# Altium PCB smoke_detector.PcbDoc
Units mm, origin at the board's own origin, x right, y up, seen from the top; angles counter-clockwise.
Board outline 85 x 24 mm, 4 copper layers (Top Copper, Signal Layer 1, Signal Layer 2, Bottom Copper), stack 0.97 mm thick; 42 components, 27 nets, 153 pads, 102 vias.
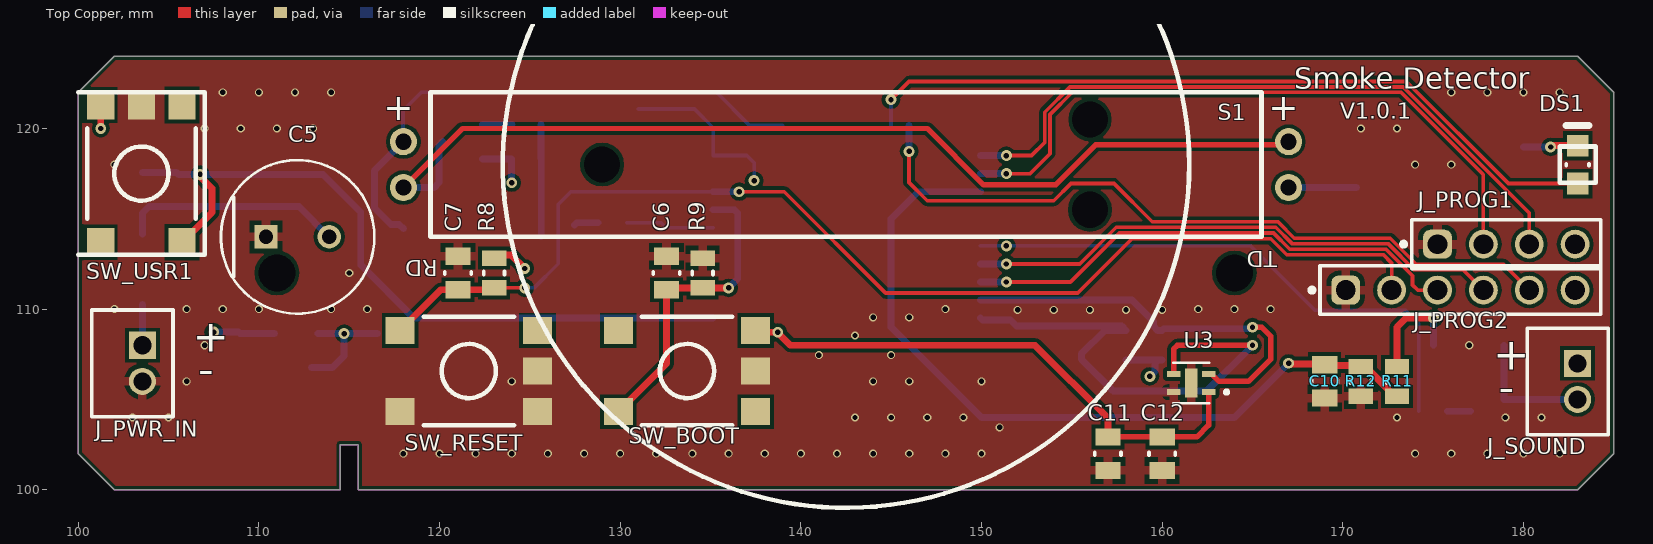
[diagram p0: Top Copper view]
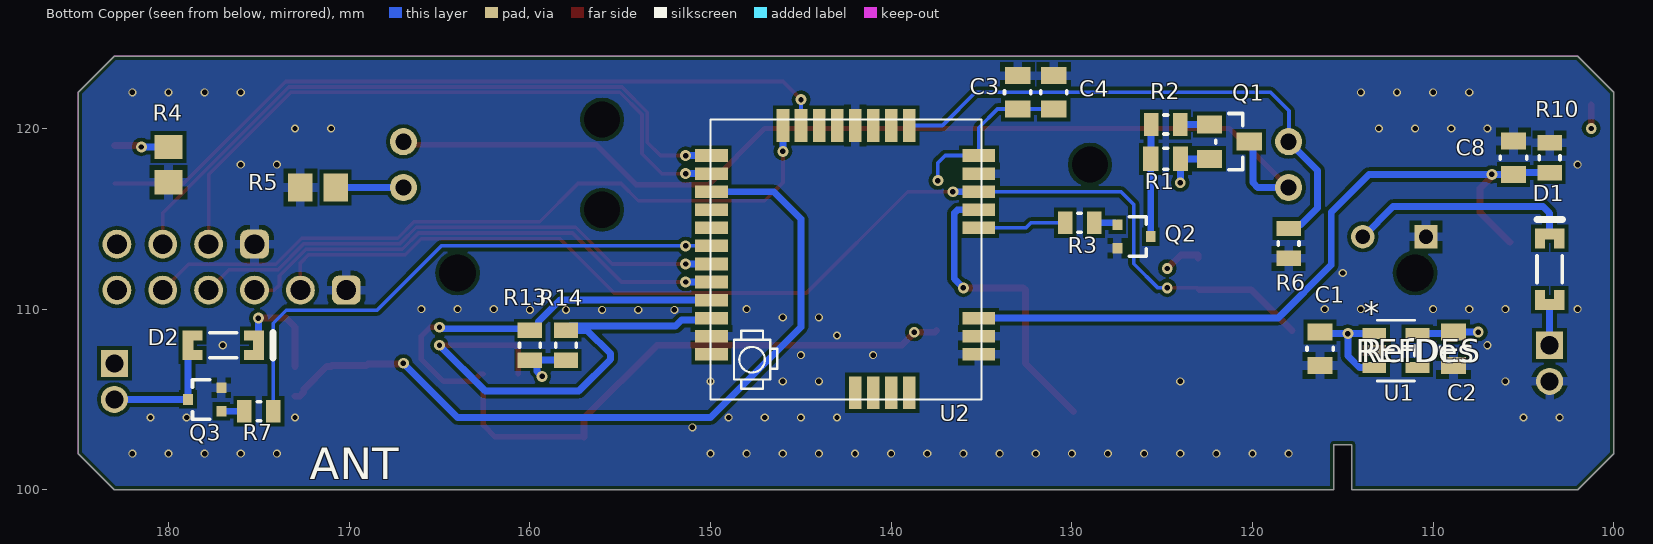
[diagram p1: Bottom Copper view, seen from below]
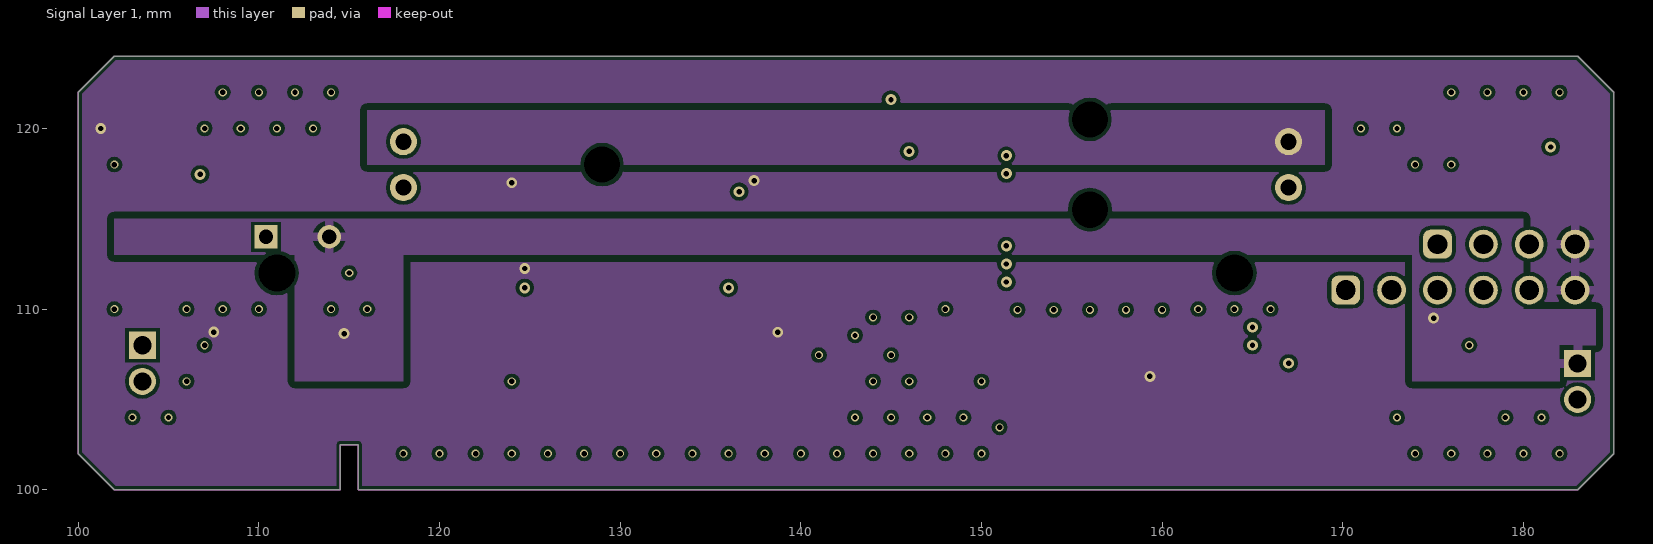
[diagram p2: Signal Layer 1]
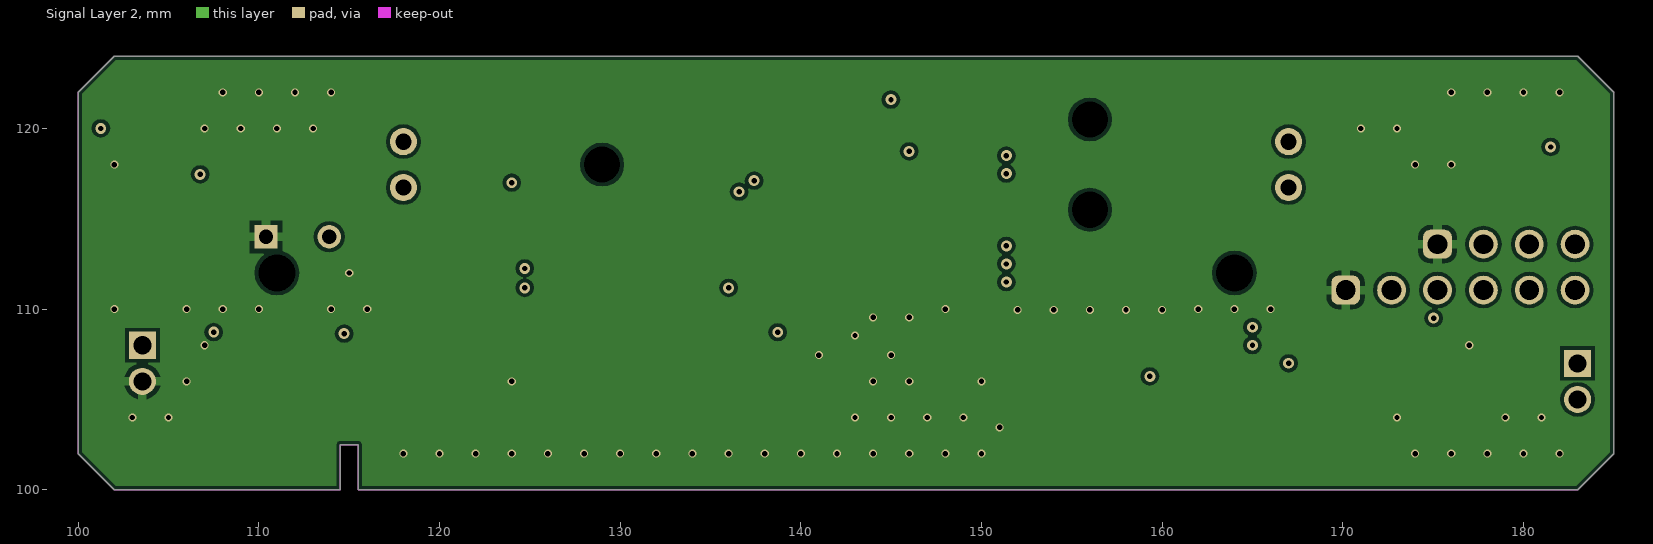
[diagram p3: Signal Layer 2]

## Layer stack, top to bottom
Top Mask: solder mask 0.015, Solder Resist, Dk 3.8
Top Copper: signal copper 0.035
Dielectric 1: prepreg 0.2, 7628, Dk 4.6
Signal Layer 1: signal copper 0.0175
Core: core 0.465, FR-4, Dk 4.5
Signal Layer 2: signal copper 0.0175
Dielectric 2: prepreg 0.2, 7628, Dk 4.6
Bottom Copper: signal copper 0.035
Bottom Mask: solder mask 0.015, Solder Resist, Dk 3.8

## Board outline
102,100 100,102 100,122 102,124 183,124 185,122 185,102 183,100 115.5,100 115.5,102.5 114.5,102.5 114.5,100

## Design rules (kind name [scope] priority, off if disabled: settings)
BoardOutlineClearance [All] p1: gap=0.2 ignorepadtopadclearanceinfootprint=FALSE except(0.4: Arc-SplitBarrior Arc-SplitContinuation Track-SplitBarrior Track-SplitContinuation SMDPad-SplitBarrior SMDPad-SplitContinuation THPad-SplitBarrior THPad-SplitContinuation Via-SplitBarrior Via-SplitContinuation Fill-SplitBarrior Fill-SplitContinuation Poly-SplitBarrior Poly-SplitContinuation Region-SplitBarrior Region-SplitContinuation Text-SplitBarrior Text-SplitContinuation)
Clearance [All] p1: gap=0.2 ignorepadtopadclearanceinfootprint=FALSE except(0.089: Arc-Arc Arc-Track Arc-SMDPad Track-Track Track-SMDPad SMDPad-SMDPad; 0.127: Arc-Via Track-Via SMDPad-Via THPad-Via Via-Via; 0.254: Arc-Text Track-Text SMDPad-Text THPad-Text Via-Text Fill-Text Poly-Text Region-Text Text-Text; 0.381: Poly-Poly)
HoleSize [All] p1: absolutevalues=TRUE maxlimit=6.3 minlimit=0.2 maxpercent=80.000 minpercent=20.000
MinimumAnnularRing [All] p1: minimumring=0.076
MinimumSolderMaskSliver [All] p1: minsoldermaskwidth=0.1
PolygonConnect PolygonConnect_Inner [(InNamedPolygon('Signal Layer 1-NetQ1_3') OR InNamedPolygon('Signal Layer 1-V_3V3') OR InNamedPolygon('Signal Layer 1-V_IN') OR InNamedPolygon('Signal Layer 2-GND'))] p1: connectstyle=Direct reliefconductorwidth=0.508 reliefentries=4 polygonreliefangle="90 Angle" airgapwidth=0.254
PolygonConnect [All] p2: thpad.connectstyle=Relief thpad.reliefconductorwidth=0.508 thpad.reliefentries=4 thpad.polygonreliefangle="90 Angle" thpad.airgapwidth=0.254 smdpad.connectstyle=Relief smdpad.reliefconductorwidth=0.508 smdpad.reliefentries=4 smdpad.polygonreliefangle="90 Angle" smdpad.airgapwidth=0.254 via.connectstyle=Direct via.reliefconductorwidth=0.508 via.reliefentries=4 via.polygonreliefangle="90 Angle" via.airgapwidth=0.254
RoutingCorners [All] p1: cornerstyle=Round minsetback=2.54 maxsetback=2.54
RoutingVias [All] p1: holewidth=0.3 width=0.45 viastyle="Through Hole" minholewidth=0.2 minwidth=0.45 maxholewidth=1 maxwidth=2
SilkToSilkClearance [All] p1: silktosilkclearance=0.1
SilkToSolderMaskClearance [IsPad] p1: minsilkscreentomaskgap=0.1 clearancetoexposedcopper=TRUE
SolderMaskExpansion [All] p1: expansion=0.102 istentingtop=FALSE
Width [All] p1: maxlimit=2.54 minlimit=0.089 preferedwidth=0.381
25 further rules are at their usual default settings.

## Components (designator, comment, footprint, x,y, rotation, side; value= is the part's Value field where it differs from the comment)
C1 "CC0805KFX7R7BB105" FP-CC0805-0_85-MFG 116.259,107.803 r270 bottom value="1 uF"
C2 "CC0805KFX7R7BB105" FP-CC0805-0_85-MFG 108.872,107.803 r270 bottom value="1 uF"
C3 "CC0805KFX7R7BB105" FP-CC0805-0_85-MFG 133,122 r90 bottom value="1 uF"
C4 "CC0805KRX7R7BB104" FP-CC0805-0_85-MFG 131,122 r90 bottom value="100 nF"
C5 "EEUFC1C221B" FP-RAD-TH-D_8_0_5-L_11_5-MFG 112.145,114 r0 top locked
C6 "CC0805KRX7R7BB104" FP-CC0805-0_85-MFG 132.564,112 r90 top value="100 nF"
C7 "CC0805KRX7R7BB104" FP-CC0805-0_85-MFG 121.024,112 r90 top value="100 nF"
C8 "CC0805KRX7R7BB104" FP-CC0805-0_85-MFG 105.55,118.38 r90 bottom value="100 nF"
C10 "CC0805KRX7R7BB104" FP-CC0805-0_85-MFG 169,106 r270 top value="100 nF"
C11 "CC0805KRX7R7BB104" FP-CC0805-0_85-MFG 157,102 r270 top value="100 nF"
C12 "CC0805KRX7R7BB104" FP-CC0805-0_85-MFG 160,102 r270 top value="100 nF"
D1 "LL4148" FAIR-SOD80-2_V 103.55,112.215 r90 bottom
D2 "LL4148" FAIR-SOD80-2_V 176.975,108 r180 bottom
DS1 "LTST-C170KRKT" LTST-C170KRKT_V 183,118 r90 top locked
J_PROG1 "61300411121" 61300411121 179.051,113.594 r0 top locked
J_PROG2 "61300611121" 61300611121 176.511,111.054 r0 top locked
J_PWR_IN "B2B-PH-K-S(LF)(SN)" JST-B2B-PH-K-S_V 103,107 r270 top
J_SOUND "B2B-PH-K-S(LF)(SN)" JST-B2B-PH-K-S_V 182.45,106 r270 top locked
Q1 "KST92MTF" FP-318BM-MFG 121.279,119.27 r180 bottom
Q2 "BC847BW,115" FP-SOT323-MFG 126.556,114.017 r180 bottom
Q3 "BC847BW,115" FP-SOT323-MFG 178,105 r0 bottom
R1 "SG73S2ATTD1002F" RESC2013X60X30LL20T20 124.807,118.32 r0 bottom value=10kR
R2 "RC0805JR-131KL" RESC2013X60X35LL10T20 124.807,120.22 r180 bottom value=1kR
R3 "RC0805JR-131KL" RESC2013X60X35LL10T20 129.568,114.783 r180 bottom value=1kR
R4 "ERJ-6GEYJ331V" RESC2013X70X40ML20T20 180,118 r90 bottom locked value=330R
R5 "ERJ-6GEYJ331V" RESC2013X70X40ML20T20 171.73,116.73 r180 bottom value=330R
R6 "SG73S2ATTD1002F" RESC2013X60X30LL20T20 118,113.635 r90 bottom value=10kR
R7 "RC0805JR-131KL" RESC2013X60X35LL10T20 175,104.35 r0 bottom value=1kR
R8 "SG73S2ATTD1002F" RESC2013X60X30LL20T20 123.024,112 r90 top value=10kR
R9 "SG73S2ATTD1002F" RESC2013X60X30LL20T20 134.564,112 r270 top value=10kR
R10 "SG73S2ATTD1002F" RESC2013X60X30LL20T20 103.55,118.38 r270 bottom value=10kR
R11 "SG73S2ATTD1002F" RESC2013X60X30LL20T20 173,106 r90 top value=1MR
R12 "SG73S2ATTD1002F" RESC2013X60X30LL20T20 171,106 r90 top value=2MR
R13 "SG73S2ATTD1002F" RESC2013X60X30LL20T20 160,108 r270 bottom value=10kR
R14 "SG73S2ATTD1002F" RESC2013X60X30LL20T20 158,108 r270 bottom value=10kR
S1 "Smoke IR Sensor" smoke_ir_sensor_1 142.5,118 r180 top locked
SW_BOOT "tactile_6_by_6_mm" tactile_6_by_6_mm 133.699,106.574 r0 top
SW_RESET "tactile_6_by_6_mm" tactile_6_by_6_mm 121.62,106.574 r0 top
SW_USR1 "tactile_6_by_6_mm" tactile_6_by_6_mm 103.5,117.5 r90 top locked
U1 "RT9013-33GB" SOT-23-5_RIT 112.066,107.703 r180 bottom
U2 "RAK3172" RAK3172 135,105 r90 bottom locked
U3 "SHTC3" SON100P200X200X80-5N 161.604,105.908 r180 top

## Footprints (in the part's own frame and the unit in brackets; to place one, negate y for a bottom-side part, rotate by r counter-clockwise, add the part's x,y. Pads: shape width x height; smd on the part's side, far side on the other; paste and mask are expansions set on the pad)
61300411121 [mm]
  rrect50% 1.6x1.6 hole 1.1: 1(-3.81,0)
  round 1.6 hole 1.1: 2(-1.27,0) 3(1.27,0) 4(3.81,0)
  silkscreen extent -5.8,-1.35 5.23,1.35, body extent -5.08,-1.27 5.08,1.27, height 8.57
61300611121 [mm]
  rrect50% 1.6x1.6 hole 1.1: 1(-6.35,0)
  round 1.6 hole 1.1: 2(-3.81,0) 3(-1.27,0) 4(1.27,0) 5(3.81,0) 6(6.35,0)
  silkscreen extent -8.34,-1.35 7.77,1.35, body extent -7.62,-1.27 7.62,1.27, height 8.57
FAIR-SOD80-2_V [mm]
  rect 0.6x1.65 smd: 1(-1.95,0) 2(1.95,0)
  rect 1.1x0.575 smd: ""(-1.7,-0.537) ""(-1.7,0.537) ""(1.7,-0.537) ""(1.7,0.537)
  silkscreen extent -0.75,-0.7 2.75,0.7, body extent -1.73,-0.7 1.72,0.7, height 2.1
FP-318BM-MFG [mm]
  rect 1.4x1 smd paste+0 mask+0: 1(-1.1,0.95) 2(-1.1,-0.95) 3(1.1,0)
  silkscreen extent -0.75,-1.56 0.75,1.56, body extent -1.2,-1.46 1.2,1.46, height 1.2
FP-CC0805-0_85-MFG [mm]
  rect 0.95x1.4 smd paste+0 mask+0: 1(-0.925,0) 2(0.925,0)
  silkscreen extent -0.08,-0.72 0.08,0.72, body extent -1,-0.63 1,0.63, height 0.95
FP-RAD-TH-D_8_0_5-L_11_5-MFG [mm]
  rect 1.3x1.3 hole 0.8 paste-2539.97 mask+0: 1(-1.75,0)
  round 1.3 hole 0.8 paste-2539.97 mask+0: 2(1.75,0)
  silkscreen extent -4.25,-4.25 4.25,4.25, body extent -4.35,-4.35 4.35,4.35, height 0.25
FP-SOT323-MFG [mm]
  rect 0.55x0.6 smd paste-1000 mask+0: 1(-0.925,0.65) 2(-0.925,-0.65) 3(0.925,0)
  silkscreen extent -0.28,-1.1 0.67,1.1, body extent -1.05,-1 1.05,1, height 1.1
JST-B2B-PH-K-S_V [mm]
  rect 1.5x1.5 hole 1: 1(-1,0.55)
  round 1.5 hole 1: 2(1,0.55)
  silkscreen extent -2.95,-2.25 2.95,2.25, body extent -2.95,-2.25 2.95,2.25, height 6
LTST-C170KRKT_V [mm]
  rect 1.2x1.2 smd: 1(-1.05,0) 2(1.05,0)
  silkscreen extent -0.05,-0.63 2.16,0.64, body extent -1,-0.63 1,0.63, height 1.2
RAK3172 [mm]
  rect 0.7x1.8 smd: 1(13.5,14.945) 2(12.5,14.945) 3(11.5,14.945) 4(10.5,14.945) 5(9.5,14.945) 6(8.5,14.945) 7(7.5,14.945) 8(6.5,14.945) 9(5.5,14.945) 10(4.5,14.945) 11(3.5,14.945) 12(2.5,14.945) 17(2.5,0.145) 18(3.5,0.145) 19(4.5,0.145) 20(9.5,0.145) 21(10.5,0.145) 22(11.5,0.145) 23(12.5,0.145) 24(13.5,0.145)
  rect 1.8x0.7 smd: 13(0.365,6.99) 14(0.365,5.99) 15(0.365,4.99) 16(0.365,3.99) 25(15.165,3.99) 26(15.165,4.99) 27(15.165,5.99) 28(15.165,6.99) 29(15.165,7.99) 30(15.165,8.99) 31(15.165,9.99) 32(15.165,10.99)
  silkscreen extent 0,0 15.5,15
RESC2013X60X30LL20T20 [mm]
  rect 0.85x1.35 smd: 1(-0.825,0) 2(0.825,0)
  silkscreen extent -0.1,-0.58 0.1,0.58, body extent -1.1,-0.72 1.1,0.72, height 0.6
RESC2013X60X35LL10T20 [mm]
  rect 0.8x1.25 smd: 1(-0.8,0) 2(0.8,0)
  silkscreen extent -0.1,-0.53 0.1,0.53, body extent -1.05,-0.67 1.05,0.67, height 0.6
RESC2013X70X40ML20T20 [mm]
  rect 1.35x1.55 smd: 1(-0.975,0) 2(0.975,0)
  body extent -1.1,-0.72 1.1,0.72, height 0.7
smoke_ir_sensor_1 [mm]
  round 0 hole 2 unplated: 0(-13.5,-2.5) 0(-13.5,2.5) 0(13.5,0)
  round 1.5 hole 0.9: 1(-24.5,-1.27) 2(-24.5,1.27) 3(24.5,-1.27) 4(24.5,1.27)
  silkscreen extent -23,-19 23,19
SON100P200X200X80-5N [mm]
  rrect25% 0.75x0.35 smd: 1(-0.97,0.5) 2(-0.97,-0.5) 3(0.97,-0.5) 4(0.97,0.5)
  rect 0.7x1.6 smd: 5(0,0)
  silkscreen extent -2.06,-1.12 1,1.12, body extent -0.94,-0.64 1.06,1.36, height 0.75
SOT-23-5_RIT [mil]
  rect 52x24 smd paste+0 mask+0: 1(-47,36.99) 2(-47,0) 3(-47,-36.99) 4(47,-36.99) 5(47,36.99)
  silkscreen extent -41,-66 41,66, body extent -59,-61 59,61, height 67
tactile_6_by_6_mm [mm]
  rect 1.6x1.5 smd: 1(-3.8,2.25) 2(3.8,2.25) 3(-3.8,-2.25) 4(3.8,-2.25) 5(3.8,0)
  silkscreen extent -2.5,-3 2.5,3

## Part data
C1 C2 C3: library part CMP-03422-000058-1, "CC0805 1 uF X7R 10.00% 16 V", Capacitance="1 uF", Manufacturer=Yageo, Package=CC0805-0.85, Temperature="-30°C to +85°C", Temperature Characteristic=X7R, Temperature Range High=+85°C, Temperature Range Low=-30°C, Tolerance=0.1, Voltage Rating="16 V", Automotive=No, Category=Cap, ComponentLink2Description=Datasheet, ComponentLink2URL=http://www.yageo.com/documents/recent/UPY-GPHC_Y5V_6.3V-to-50V_8.pdf, Device Class L1="Passive Components", Device Class L2=Capacitors, Device Class L3="Ceramic Capacitors", Footprint Url=http://www.yageo.com/exep/pages/download/literatures/UPY-C_GEN_24.pdf, Height=0.95mm, Ipc Land Pattern Name=CAPC200125X85, Lead Free=Yes, Manufacturer Part Number=CC0805KFX7R7BB105, Material=Ceramic, Mouser Description="Multilayer Ceramic Capacitors MLCC - SMD/SMT 1.0uF 16V X7R 10%", Octopart=https://octopart.com/cc0805kfx7r7bb105-yageo-30261725, RoHS=TRUE
C4 C6 C7 C8 C10 C11 C12: library part CMP-1036-04402-6, "CAP CER 0.1UF 16V X7R 0805", Capacitance="100 nF", Manufacturer=Yageo, Package=CC0805-0.85, Temperature="-30°C to +85°C", Temperature Characteristic=X7R, Temperature Range High=+85°C, Temperature Range Low=-30°C, Tolerance=0.1, Voltage Rating="16 V", Automotive=No, Category=Cap, ComponentLink2Description=Datasheet, ComponentLink2URL=http://www.yageo.com/documents/recent/UPY-GPHC_Y5V_6.3V-to-50V_8.pdf, Device Class L1="Passive Components", Device Class L2=Capacitors, Device Class L3="Ceramic Capacitors", Digikey Description="CAP CER 0.1UF 16V X7R 0805", Footprint Url=http://www.yageo.com/exep/pages/download/literatures/UPY-C_GEN_24.pdf, Height=0.95mm, Ipc Land Pattern Name=CAPC200125X85, Lead Free=Yes, Manufacturer Part Number=CC0805KRX7R7BB104, Material=Ceramic, Mouser Description="Multilayer Ceramic Capacitors MLCC - SMD/SMT 100nF 16V X7R 10%", Octopart=https://octopart.com/cc0805krx7r7bb104-yageo-39467769, RoHS=TRUE
C5: library part CMP-05427-002014-1, "Aluminum Electrolytic Capacitors (Radial Lead Type) AEC-Q200 Qualified 220uF ±20% 16V", Capacitance=220uF, Case/Package=Radial, Max Operating Temperature=105°C, Min Operating Temperature=-55°C, Package Quantity=1000, Ratings=AEC-Q200, Ripple Current=555mA, Tolerance=20%, Voltage Rating=16V, Diameter=8mm, Height=11.5mm, Height - Seated (Max)=0.492inch, Impedance=117mR, Lead Diameter=0.6mm, Lead Pitch=5mm, Length=11mm, Life (Hours)=2000Hour, Mount="Through Hole", Packaging="Ammo Pack", Polarity=Polar, Radiation Hardening=No, RoHS Compliant=Yes, Series=FC, Termination=Radial, Voltage Rating (DC)=16V
D1 D2: library part CMP-2000-05115-2, "Small Signal Diode, 100 V, 0.2 A, -55 to 175 degC, 2-Pin SOD80, RoHS, Tape and Reel", Average Forward Current-Max=200mA, Forward Voltage=1V, Manufacturer=Fairchild, Power Dissipation=500mW, Reverse Voltage-Max [Vrrm]=100V, Datasheet URL=https://www.fairchildsemi.com/datasheets/LL/LL4148.pdf, Datasheet Version="Rev. 1.8, 01/2016", Manufacturer URL=https://www.fairchildsemi.com/, Reverse Recovery Time-Max=1ns
DS1: library part CMP-2000-07593-1, "LED Red, 75 mW, 54 mcd, -55 to 85 degC, 2-Pin SMD, RoHS, Tape and Reel", Case Code (Imperial)=0805, Case Code (Metric)=2012, Colour=Red, Forward Current=30mA, Forward Voltage=2V, Lens Colour=Colorless, Manufacturer=Lite-On, Max Operating Temperature=85degC, Min Operating Temperature=-55degC, Package Description="2-Pin Surface Mount Device, Body 2 x 1.25 mm", Package Quantity=1, Package Reference=C170KRKT, Power Dissipation=75mW, Test Current=20mA, Case\/Package=0805, Datasheet URL=http://optoelectronics.liteon.com/upload/download/DS-22-99-0150/LTST-C170KRKT.pdf, Datasheet Version="Rev. D, 11/2014", Depth=1.6mm, Dominant Wavelength=631nm, Height=1.1mm, Illumination Colour=Red, Lead Free=LeadFree, Length=3.2mm, Lens Style=Rectangular, Lens Transparency=Clear, Luminous Intensity=54mcd, Manufacturer URL=http://www.us.liteon.com/, Mount=SurfaceMount, Mounting Technology=SurfaceMount, Number of Elements=1, Number of LEDs=1, Number of Pins=2, Packaging=TapeandReel, Power Rating=75mW, Radiation Hardening=No, RoHSCompliant=True, Viewing Angle=130degrees, Wavelength=639nm, Width=1.25mm
J_PROG1: library part CMP-1502-01064-3, Color=Black, Contact Resistance=20mΩ, Current Rating=3A, Max Operating Temperature=105°C, Min Operating Temperature=-40°C, Operating Supply Voltage=250V, Connector Type="Male Pin", Contact Material=Copper, Contact Mating Length=5.9944mm, Contact Plating=Gold, Gender=Male, Height=8.89mm, Lead Free="Lead Free", Lead Pitch=2.54mm, Mount="Through Hole", NexarPartId=32855522, Number of Contacts=4, Number of Pins=4, Number of Positions=4, Number of Rows=1, Orientation=Vertical, Packaging=Bulk, Pitch=2.54mm, REACH SVHC=Unknown, RoHS=Compliant, Termination=Solder, Voltage Rating=250V
J_PROG2: library part CMP-1502-01070-3, Color=Black, Contact Resistance=20mΩ, Current Rating=3A, Max Operating Temperature=105°C, Min Operating Temperature=-40°C, Operating Supply Voltage=250V, Connector Type="Male Pin", Contact Gender=Male, Contact Material=Copper, Contact Mating Length=5.9944mm, Contact Plating=Gold, Gender=Male, Height=8.89mm, Housing Material=PBT, Lead Free="Lead Free", Lead Pitch=2.54mm, Mount="Through Hole", NexarPartId=20084590, Number of Contacts=6, Number of Pins=6, Number of Positions=6, Number of Rows=1, Orientation=Vertical, Packaging=Bulk, Pitch=2.54mm, REACH SVHC=Unknown, RoHS=Compliant, Termination="Through Hole", Voltage Rating=250V
J_PWR_IN J_SOUND: library part CMP-2000-05162-1, "Male Header, Pitch 2 mm, 1 x 2 Position, Height 6 mm, Tail Length 3.4 mm, -25 to 85 degC, RoHS, Bulk", Manufacturer=JST, Datasheet URL=http://datasheet.octopart.com/B2B-PH-K-S%28LF%29%28SN%29-JST-datasheet-8324864.pdf, Datasheet Version=Nov-08, Manufacturer URL=http://www.jst.com/home2.html, No of Positions=2, Pitch=2mm, Style/Orientation=StraightHeader/Plug, Termination=Crimp, Type=ShroudedHeader
Q1: library part CMP-00278-84329678-1, "KST92MTF Trans Gp Bjt PNP 300V 0.5A 250MW 3-PIN SOT-23 T/r / Trans PNP 300V 0.5A SOT23", Case/Package=SOT-23, Collector Base Voltage (VCBO)=-300V, Collector Emitter Saturation Voltage=-500mV, Current=5A, Current Rating=-500mA, Emitter Base Voltage (VEBO)=-5V, Frequency=50MHz, Manufacturer Lifecycle Status=OBSOLETE, Max Breakdown Voltage=300V, Max Junction Temperature (Tj)=150°C, Max Power Dissipation=250mW, Min Operating Temperature=-55°C, Power Dissipation=350mW, Voltage=200V, Collector Emitter Breakdown Voltage=-300V, Collector Emitter Voltage (VCEO)=-300V, Element Configuration=Single, Gain Bandwidth Product=50MHz, Height=1.2mm, hFE Min=25, Lead Free="Lead Free", Length=2.9mm, Lifecycle Status=Obsolete, Max Collector Current=-500mA, Max Frequency=50MHz, Max Operating Temperature=150°C, Mount="Surface Mount", NexarPartId=84329678, Number of Elements=1, Number of Pins=3, Packaging="Cut Tape", Polarity=PNP, Radiation Hardening=No, REACH SVHC="No SVHC", RoHS=Compliant, Schedule B=8541210080, Transition Frequency=50MHz, Voltage Rating (DC)=-300V, Weight=59.987591mg, Width=1.3mm
Q2 Q3: library part CMP-14406-000044-1, "TRANS NPN 45V 100MA SOT323", RoHS Compliant=Yes
R1 R6 R8 R9 R10 R11 R12 R13 R14: library part CMP-2001-02616-1, Manufacturer="KOA Speer", Part Number=SG73S2ATTD1002F
R2 R3 R7: library part CMP-2001-01418-1, Manufacturer=Yageo, Part Number=RC0805JR-131KL
R4 R5: library part CMP-1013-00062-2, Manufacturer=Panasonic, Part Number=ERJ-6GEYJ331V
S1: library part smoke_ir_sensor_1
U1: "No Description Available", Manufacturer_Name="Richtek Technology", Copyright="Copyright (C) 2025 Ultra Librarian. All rights reserved.", Manufacturer_Part_Number=RT9013-33GB, RefDes=RefDes, Type=Type
U2: "RAK3172 is a low-power long-range transceiver module based on the STM32WLE5CC chip. It provides an easy-to-use, small-size, low-power solution for long range wireless data applications", Package=Package, Availability="Not in stock", Check_prices=https://www.snapeda.com/parts/RAK3172/Shenzhen+RAKwireless+Technology+Co.%252CLtd./view-part/?ref=eda, MF="Shenzhen RAKwireless Technology Co.,Ltd.", MP=RAK3172, Price=None, SnapEDA_Link=https://www.snapeda.com/parts/RAK3172/Shenzhen+RAKwireless+Technology+Co.%252CLtd./view-part/?ref=snap
U3: "SENSOR HUMI/TEMP I2C 2% SMD", Package="DFN-4 Sensirion", Check_prices=https://www.snapeda.com/parts/SHTC3/Sensirion/view-part/?ref=eda, MF="Sensirion AG", MP=SHTC3, SnapEDA_Link=https://www.snapeda.com/parts/SHTC3/Sensirion/view-part/?ref=snap

## Free pads (board coordinates)
  rect 0x0 hole 2.05 unplated: 0(111,112) 1(164,112)

## Via types
v1: diameter 0.45, hole 0.3, Top Copper to Bottom Copper, 78 vias
v2: diameter 0.6, hole 0.3, Top Copper to Bottom Copper, tented both sides, 24 vias

## Nets (pads, with @x,y where several pads share a name; then routed paths per layer and width w, separated by ;. In a path a pad name is that pad's centre, name@x,y a point inside that pad or via, vN(x,y) a via of type N, cw(c..) or ccw(c..) an arc to the next point about the centre after c; other vN are vias at no path point)
BAT: C10.1 R11.1 R12.2 U2.3 | length 43.7
  Top Copper w0.381: v2(167,107) 167.037,106.962 168.962,106.962 169.05,106.875 170.95,106.875 R12.2 171.25,106.825 172.515,105.559 172.515,105.409 172.75,105.175 R11.1
  Bottom Copper w0.381: U2.3 146.5,116.5 145,115 145,109 150,104 164,104 v2(167,107)
BTN_USR1: C8.1 R10.2 SW_USR1.3 U2.19 | length 41.4
  Top Copper w0.381: SW_USR1.3 107.41,115.36 107.41,116.69 106.75,117.35 v2(106.75,117.455)
  Bottom Copper w0.381: R10.2 105.45,117.555 C8.1 v2(106.75,117.455) 113.545,117.455 115.642,115.358 115.642,112.431 118.574,109.5 U2.19
BUZZER_CTRL: R7.1 U2.6 | length 30.9
  Bottom Copper w0.203: U2.6 164.905,113.5 168.461,109.945 173.478,109.945 174.2,109.223 R7.1
  other v2: 151.381,113.5
GND: C1.2 C2.2 C3.2 C4.2 C5.1 C6.2 C7.2 C8.2 C10.2 C11.2 C12.2 J_PROG1.1 J_PROG2.1 J_PWR_IN.2 Q2.2 Q3.2 R4.1 R5.1 R6.1 R9.1 R10.1 R12.1 SW_BOOT.5 SW_RESET.3 SW_RESET.4 SW_RESET.5 SW_USR1.5 U1.2 U2.11 U2.17 U2.18 U2.23 U2.28 U3.4 U3.5
  other v1: 118,102 120,102 122,102 124,102 126,102 128,102 130,102 132,102 134,102 136,102 138,102 140,102 142,102 144,102 146,102 148,102 150,102 174,102 176,102 178,102 180,102 182,102 151,103.457 103,104 105,104 143,104 145,104 147,104 149,104 173,104 179,104 181,104 106,106 124,106 144,106 146,106 150,106 141,107.457 145,107.457 107,108 177,108 143,108.543 144,109.543 146,109.543 152,109.957 154,109.957 156,109.957 158,109.957 160,109.957 102,110 106,110 108,110 110,110 114,110 116,110 148,110 162,110 164,110 166,110 166,110 115,112 102,118 174,118 176,118 107,120 109,120 111,120 113,120 171,120 173,120 108,122 110,122 112,122 114,122 176,122 178,122 180,122 182,122
IR_ADC: R6.2 S1.3 U2.25 | length 30.3
  Bottom Copper w0.203: S1.3 117.978,119.292 117.978,120.978 119,122 135.328,122 137.163,120.165 U2.25
  Bottom Copper w0.381: R6.2 117.765,114.695 117.305,114.695 116.398,115.602 116.398,117.668 S1.3
IR_CTRL: R3.1 U2.20 | length 4.9
  Bottom Copper w0.203: R3.1 132.258,114.783 132.541,114.5 U2.20
LED_USR1: DS1.1 U2.31 | length 42.2
  Top Copper w0.203: v2(144.99,121.601) 145.992,122.603 158.41,122.603 173.518,122.603 179.171,116.95 DS1.1
  Bottom Copper w0.203: U2.31 v2(144.99,121.601)
NetD1_1: D1.1 J_PWR_IN.1 | length 2.3
  Bottom Copper w0.381: J_PWR_IN.1 D1.1@103.55,110.265
NetD2_1: D2.1 J_SOUND.2 Q3.3 | length 7.1
  Bottom Copper w0.381: D2.1 Q3.3 J_SOUND.2
NetDS1_2: DS1.2 R4.2 | length 3
  Top Copper w0.381: v2(181.5,118.975) 181.575,119.05 DS1.2
  Bottom Copper w0.381: R4.2 v2(181.5,118.975)
NetQ1_1: Q1.1 R2.2 | length 1.6
  Bottom Copper w0.381: Q1.1 R2.2
NetQ1_3: Q1.3 S1.1 S1.4 | length 57.1
  Top Copper w0.3: S1.4 121.27,120 147,120 150.118,116.883 154.103,116.883 156.33,119.11 166.839,119.11 S1.1
  Bottom Copper w0.381: S1.4 119.709,116.73 119.979,117 119.979,119.07 Q1.3
NetQ2_1: Q2.1 R3.2 | length 1.3
  Bottom Copper w0.381: Q2.1 127.598,114.783 R3.2
NetQ2_3: Q2.3 R1.2 R2.1 | length 6.2
  Bottom Copper w0.381: R2.1 125.607,118.345 R1.2 Q2.3
NetQ3_1: Q3.1 R7.2 | length 1.3
  Bottom Copper w0.381: R7.2 Q3.1
NetR5_2: R5.2 S1.2 | length 3.8
  Bottom Copper w0.381: S1.2 R5.2
RAK_BOOT0: C6.1 R9.2 SW_BOOT.3 U2.21 | length 17.1
  Top Copper w0.381: SW_BOOT.3 132.564,106.99 C6.1 132.664,111.175 R9.2 v2(136,111.175)
  Bottom Copper w0.381: U2.21 136.32,115.5 136.505,115.315 136.505,111.68 v2(136,111.175)
RAK_RESET: C7.1 J_PROG2.2 R8.1 SW_RESET.1 U2.22 | length 65.6
  Top Copper w0.203: R8.1@122.924,111.075 R8.1 v2(124.719,111.175) ; v2(136.581,116.5) 139.081,116.5 144.691,110.89 155.325,110.89 158.334,113.898 166.006,113.898 166.894,113.01 172.248,113.01 172.701,112.557 J_PROG2.2
  Top Copper w0.381: SW_RESET.1 120.071,111.075 C7.1 R8.1@122.924,111.075
  Bottom Copper w0.203: v2(124.719,111.175) 125.235,111.175 126.569,112.51 126.569,115.791 127.278,116.5 U2.22
  Bottom Copper w0.381: U2.22 v2(136.581,116.5)
RAK_SCL: R13.1 U2.9 U3.2 | length 22.6
  Top Copper w0.3: U3.2 162.743,106.408 163.151,106 164.777,106 166,107.223 166,108.51 165.51,109 v2(165,109)
  Bottom Copper w0.381: U2.9 158.325,110.5 159.516,109.309 159.516,109.059 159.75,108.825 R13.1 160.088,108.912 164.912,108.912 v2(165,109)
RAK_SDA: R14.1 U2.10 U3.3 | length 28.7
  Top Copper w0.3: U3.3 160.634,107.79 160.844,108 v2(165,108)
  Bottom Copper w0.381: U2.10 150.049,109.396 151.604,109.396 151.941,109.059 157.765,109.059 R14.1 156.825,108.825 155.539,107.539 155.539,107.223 157.293,105.469 162.469,105.469 v2(165,108)
RAK_SWCLK: J_PROG2.3 U2.8 | length 28
  Top Copper w0.203: v2(151.381,111.5) 154.921,111.5 157.635,114.214 166.162,114.214 167.063,113.313 172.395,113.313 173.859,111.849 173.859,111.34 174.145,111.054 J_PROG2.3
  Bottom Copper w0.381: U2.8 v2(151.381,111.5)
RAK_SWDIO: J_PROG2.4 U2.7 | length 30.1
  Top Copper w0.203: v2(151.381,112.5) 155.438,112.5 157.465,114.527 166.292,114.527 167.192,113.627 172.498,113.627 173.944,112.181 176.654,112.181 J_PROG2.4
  Bottom Copper w0.381: U2.7 v2(151.381,112.5)
RAK_SWO: J_PROG2.5 U2.32 | length 40.7
  Top Copper w0.203: v2(145.99,118.729) 145.99,117.01 147,116 154,116 154.951,116.951 157.333,116.951 159.454,114.83 166.417,114.83 167.318,113.929 172.623,113.929 174.069,112.483 178.891,112.483 J_PROG2.5
  Bottom Copper w0.381: v2(145.99,118.729) U2.32
RAK_U2_RXD: J_PROG1.3 U2.1 | length 37.5
  Top Copper w0.203: v2(151.381,118.5) 152.775,118.5 153.499,119.225 153.499,120.896 154.899,122.295 173.347,122.295 180.321,115.322 J_PROG1.3
  Bottom Copper w0.381: U2.1 v2(151.381,118.5)
RAK_U2_TXD: J_PROG1.2 U2.2 | length 36.7
  Top Copper w0.203: v2(151.381,117.5) 152.689,117.5 153.795,118.606 153.795,120.773 155.022,122 173.228,122 177.781,117.447 J_PROG1.2
  Bottom Copper w0.381: U2.2 v2(151.381,117.5)
V_3V3: C2.1 C3.1 C4.1 C11.1 C12.1 J_PROG1.4 J_PROG2.6 Q1.2 R1.1 R8.2 R13.2 R14.2 SW_BOOT.2 SW_USR1.2 U1.5 U2.24 U3.1 | length 52.7
  Top Copper w0.3: C11.1 C12.1 161.925,102.925 162.574,103.574 U3.1
  Top Copper w0.381: v2(101.25,120) SW_USR1.2 ; R8.2 123.024,112.976 123,113 123.969,113 v2(124.719,112.25) ; SW_BOOT.2 137.604,108.718 v2(138.718,108.718) 139.437,108 152.971,108 157,103.971 C11.1
  Bottom Copper w0.203: C4.1 C3.1 134.112,121.075 135.145,120.042 U2.24 137.011,118.5 137.413,118.098 v2(137.413,117.114)
  Bottom Copper w0.381: v2(107.5,108.728) C2.1 108.958,108.642 U1.5 ; Q1.2 R1.1 123.982,117.018 v2(124,117) ; R14.2 R13.2@159.794,107.175 ; v2(159.322,106.278) 159.322,106.285 159.597,106.559 159.597,106.978 R13.2@159.794,107.175 ; R13.2 R13.2@159.794,107.175
V_IN: C1.1 C5.2 D1.2 D2.2 J_SOUND.1 R11.2 U1.1 U1.3 | length 24.9
  Top Copper w0.381: R11.2 173,109 173.5,109.5 v2(175.025,109.5)
  Bottom Copper w0.381: D1.2 103.55,115.309 103.924,115.683 112.212,115.683 C5.2 ; U1.3@112.904,106.763 U1.3 114.069,106.763 114.716,107.41 v2(114.716,108.642) ; U1.1 v2(114.716,108.642) ; C1.1@116.57,108.642 v2(114.716,108.642) ; D2.2 v2(175.025,109.5)
pads on no net: D1. D2. S1.0 SW_BOOT.1 SW_BOOT.4 SW_RESET.2 SW_USR1.1 SW_USR1.4 U1.4 U2.4 U2.5 U2.12 U2.13 U2.14 U2.15 U2.16 U2.26 U2.27 U2.29 U2.30

## Polygon pours and split planes (outlines as drawn)
V_3V3 on Signal Layer 1 "Signal Layer 1-V_3V3" (solid, pour order 5): 102,100 100,102 100,122 102,124 183,124 185,122 185,102 183,100 115.5,100 115.5,102.5 114.5,102.5 114.5,100
V_IN on Signal Layer 1 "Signal Layer 1-V_IN" (solid, pour order 3): 112,106 112,113 102,113 102,115 180,115 180,110 184,110 184,106 173.839,106 173.839,113 118,113 118,106
NetQ1_3 on Signal Layer 1 "Signal Layer 1-NetQ1_3" (solid, pour order 4): 116,118 116,121 169,121 169,118
GND on Signal Layer 2 "Signal Layer 2-GND" (solid, pour order 0): 102,100 100,102 100,122 102,124 183,124 185,122 185,102 183,100 115.5,100 115.5,102.5 114.5,102.5 114.5,100
GND on Bottom Copper "GND_L04_P007" (solid, pour order 7): 102,100 100,102 100,122 102,124 183,124 185,122 185,102 183,100 115.5,100 115.5,102.5 114.5,102.5 114.5,100
GND on Top Copper "Top GND" (solid, pour order 6): 102,100 100,102 100,122 102,124 183,124 185,122 185,102 183,100 115.5,100 115.5,102.5 114.5,102.5 114.5,100

## Keep-outs
Keep-Out Layer:
  the board outline again, w0.025

## Silkscreen, mask and mechanical layers (free items; w line width, h text height)
Top Overlay:
  lines w0.254: 100,113 107,113 107,122 100,122 ; 182,117 182,119 184,119 184,117 182,117
  text "Smoke Detector" at 167.307,121.81 h2
  text "V1.0.1" at 169.849,120.245 h1.52
  text "+" at 106.328,107.053 h3
  text "+" at 178.328,106.053 h3
  text "-" at 106.638,105.302 h3
  text "-" at 178.638,104.302 h3
Bottom Overlay:
  text "ANT" at 172.188,100 h3
Mechanical 1:
  lines w0.025: 100,102 102,100 114.5,100 114.5,102.5 115.5,102.5 115.5,100 183,100 185,102 185,122 183,124 102,124 100,122 100,102 ; 102,113 112,113 112,106 118,106 118,113 173.839,113 173.839,106 184,106 184,110 180,110 180,115 102,115 102,113 ; 116,118 169,118 169,121 116,121 116,118
Mechanical 2:
  lines w0.025: 152,100 172.188,100 172.188,109 152,109 152,100

## Text inside footprints (layer, text, board x,y; h text height)
S1: Top Overlay "TD" at 166.359,113.5 h1.52 r180; Top Overlay "RD" at 119.9,113 h1.52 r180; Top Overlay "+" at 167.56,122.231 h2.5 r180; Top Overlay "+" at 118.56,122.231 h2.5 r180
U1: Bottom Overlay "REFDES" at 114.288,107.068 h1.27; Bottom Overlay "*" at 113.831,109.125 h1.27; Bottom Overlay "RefDes" at 113.971,107.068 h1.27; Bottom 3D Body "*" at 112.904,107.906 h1.27; Bottom 3D Body "RefDes2" at 114.288,107.068 h1.27